# Altium PCB DB32.PcbDoc (part 5 of 8)
Units mil, origin at the board's own origin, x right, y up, seen from the top; angles counter-clockwise.
Board outline 3236.22 x 4456.69 mil, 8 copper layers (Top Layer, MidLayer1, MidLayer2, GND-Layer5, MidLayer3, VCC, MidLayer4, Bottom Layer), stack 61.8 mil thick; 207 components, 474 nets, 1777 pads, 1474 vias.
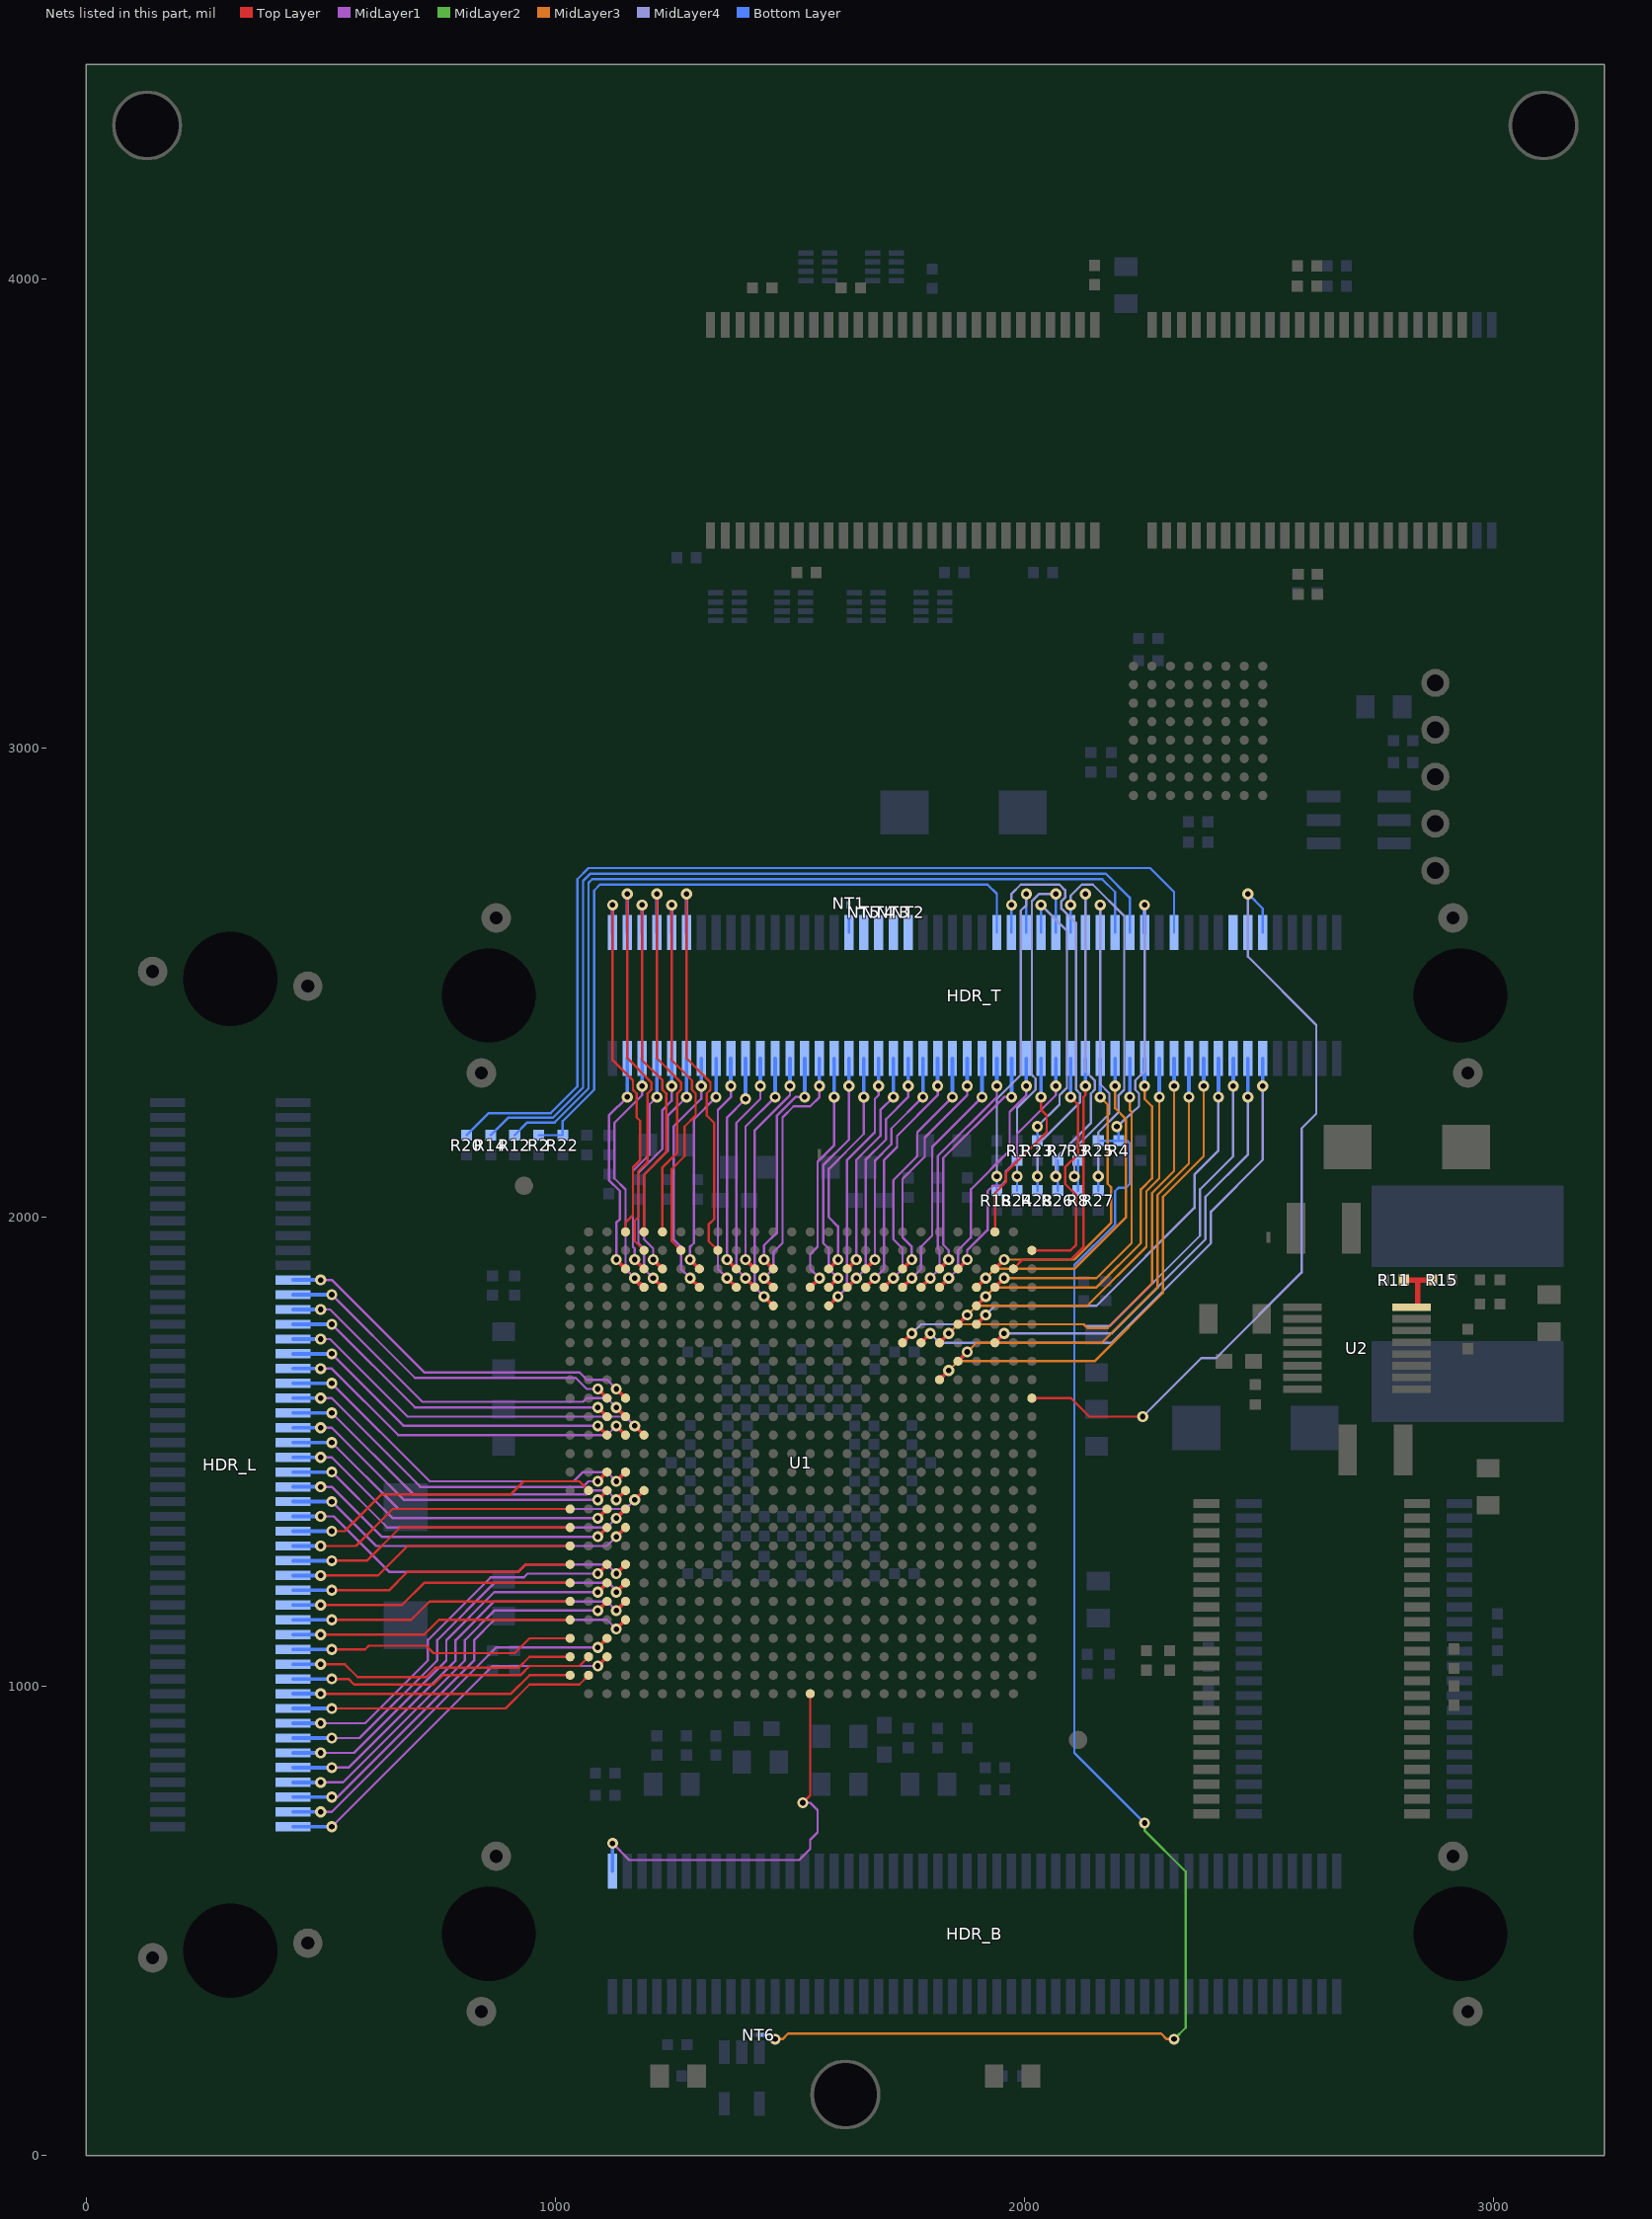
[diagram p11: the nets of this part, all layers, seen from the top]

## Via types
v1: diameter 23.62, hole 11.81, Top Layer to Bottom Layer, 839 vias
v2: diameter 23.62, hole 11.81, Top Layer to Bottom Layer, tented both sides, 499 vias
v3: diameter 27.56, hole 15.75, Top Layer to Bottom Layer, 135 vias
v4: diameter 23.62, hole 11.81, Top Layer to Bottom Layer, tented top, 1 vias

## Nets (pads, with @x,y where several pads share a name; then routed paths per layer and width w, separated by ;. In a path a pad name is that pad's centre, name@x,y a point inside that pad or via, vN(x,y) a via of type N, cw(c..) or ccw(c..) an arc to the next point about the centre after c; other vN are vias at no path point) (continued)
EXTEND_B12: HDR_L.26 U1.K4 | length 813
  Top Layer w7.87: v1(1129.92,1633.86) U1.K4@1149.61,1614.17
  MidLayer1 w5: v2(500,1866.14) 523.62,1866.14 720.47,1669.29 956.69,1669.29 968.5,1669.29 1051.18,1669.29 1066.93,1653.54 1110.23,1653.54 v1(1129.92,1633.86)
  Bottom Layer w7.87: HDR_L.26@440.94,1866.14 v2(500,1866.14)
EXTEND_B13: HDR_L.28 U1.K3 | length 760.6
  Top Layer w7.87: v1(1090.55,1633.86) U1.K3@1110.24,1614.17
  MidLayer1 w5: v2(523.62,1834.65) 700.79,1657.48 956.69,1657.48 968.5,1657.48 1043.31,1657.48 1066.93,1633.86 v1(1090.55,1633.86)
  Bottom Layer w7.87: HDR_L.28@440.94,1834.64 v2(523.62,1834.65)
EXTEND_B14: HDR_L.30 U1.L4 | length 809.8
  Top Layer w7.87: v1(1129.92,1594.49) U1.L4@1149.61,1574.8
  MidLayer1 w5: v2(500,1803.15) 519.68,1803.15 716.54,1606.3 956.69,1606.3 968.5,1606.3 1059.06,1606.3 1066.93,1614.17 1110.23,1614.17 v1(1129.92,1594.49)
  Bottom Layer w7.87: HDR_L.30@440.94,1803.15 v2(500,1803.15)
EXTEND_B15: HDR_L.32 U1.L3 | length 750.8
  Top Layer w7.87: v1(1090.55,1594.49) U1.L3@1110.24,1574.8
  MidLayer1 w5: v2(523.62,1771.66) 700.79,1594.49 956.69,1594.49 968.5,1594.49 v1(1090.55,1594.49)
  Bottom Layer w7.87: HDR_L.32@440.94,1771.65 v2(523.62,1771.66)
EXTEND_B16: HDR_L.34 U1.M5 | length 832.8
  Top Layer w7.87: v1(1169.29,1555.12) U1.M5@1188.98,1535.43
  MidLayer1 w5: v2(500,1740.16) 519.68,1740.16 685.04,1574.8 956.69,1574.8 968.5,1574.8 1149.61,1574.8 v1(1169.29,1555.12)
  Bottom Layer w7.87: HDR_L.34@440.94,1740.15 v2(500,1740.16)
EXTEND_B17: HDR_L.36 U1.M3 | length 741
  Top Layer w7.87: v1(1090.55,1555.12) U1.M3@1110.24,1535.43
  MidLayer1 w5: v2(523.62,1708.66) 677.17,1555.12 956.69,1555.12 968.51,1555.12 v1@1090.55,1555.12
  Bottom Layer w7.87: HDR_L.36@440.94,1708.66 v2(523.62,1708.66)
EXTEND_B18: HDR_L.38 U1.M4 | length 783.7
  Top Layer w7.87: v1(1129.92,1555.12) U1.M4@1149.61,1535.43
  MidLayer1 w5: v2(500,1677.17) 523.62,1677.17 665.36,1535.43 956.69,1535.43 968.5,1535.43 1110.23,1535.43 v1(1129.92,1555.12)
  Bottom Layer w7.87: HDR_L.38@440.94,1677.16 v2(500,1677.17)
EXTEND_B19: HDR_L.40 U1.P4 | length 819.6
  Top Layer w7.87: v1(1129.92,1437.01) U1.P4@1149.61,1456.69
  MidLayer1 w5: v2(523.62,1645.67) 732.29,1437.01 956.69,1437.01 968.5,1437.01 1039.37,1437.01 1059.06,1456.69 1110.23,1456.69 v1(1129.92,1437.01)
  Bottom Layer w7.87: HDR_L.40@440.94,1645.67 v2(523.62,1645.67)
EXTEND_B20: HDR_L.42 U1.P3 | length 760.6
  Top Layer w7.87: v1(1090.55,1437.01) U1.P3@1110.24,1456.69
  MidLayer1 w5: v2(500,1614.17) 523.62,1614.17 641.73,1496.06 712.6,1425.2 956.69,1425.2 968.5,1425.2 1059.06,1425.2 1070.87,1437.01 v1(1090.55,1437.01)
  Bottom Layer w7.87: HDR_L.42@440.94,1614.17 v2(500,1614.17)
EXTEND_B21: HDR_L.44 U1.R4 | length 800
  Top Layer w7.87: v1(1129.92,1397.64) U1.R4@1149.61,1417.32
  MidLayer1 w5: v2(523.62,1582.68) 696.85,1409.45 956.69,1409.45 968.5,1409.45 1066.93,1409.45 1074.8,1417.32 1110.23,1417.32 v1(1129.92,1397.64)
  Bottom Layer w7.87: HDR_L.44@440.94,1582.67 v2(523.62,1582.68)
EXTEND_B22: HDR_L.46 U1.R3 | length 741
  Top Layer w7.87: v1(1090.55,1397.64) U1.R3@1110.24,1417.32
  MidLayer1 w5: v2(500,1551.18) 523.62,1551.18 677.17,1397.64 956.69,1397.64 968.5,1397.64 v1(1090.55,1397.64)
  Bottom Layer w7.87: HDR_L.46@440.94,1551.18 v2(500,1551.18)
EXTEND_B23: HDR_L.48 U1.R5 | length 823
  Top Layer w7.87: v1(1169.29,1397.64) U1.R5@1188.98,1417.32
  MidLayer1 w5: v2(523.62,1519.68) 665.36,1377.95 956.69,1377.95 968.5,1377.95 1149.61,1377.95 v1(1169.29,1397.64)
  Bottom Layer w7.87: HDR_L.48@440.94,1519.68 v2(523.62,1519.68)
EXTEND_B24: HDR_L.50 U1.T3 | length 731.3
  Top Layer w7.87: v1(1090.55,1358.27) U1.T3@1110.24,1377.95
  MidLayer1 w5: v2(500,1488.19) 523.62,1488.19 653.54,1358.27 956.69,1358.27 968.5,1358.27 1062.99,1358.27 v1(1090.55,1358.27)
  Bottom Layer w7.87: HDR_L.50@440.94,1488.19 v2(500,1488.19)
EXTEND_B25: HDR_L.52 U1.T4 | length 773.9
  Top Layer w7.87: v1(1129.92,1358.27) U1.T4@1149.61,1377.95
  MidLayer1 w5: v2(523.62,1456.69) 641.73,1338.58 956.69,1338.58 968.5,1338.58 1110.24,1338.58 v1(1129.92,1358.27)
  Bottom Layer w7.87: HDR_L.52@440.94,1456.69 v2(523.62,1456.69)
EXTEND_B26: HDR_L.54 U1.U3 | length 721.5
  Top Layer w7.87: v1(1090.55,1318.9) U1.U3@1110.24,1338.58
  MidLayer1 w5: v2(500,1425.2) 523.62,1425.2 629.92,1318.9 956.69,1318.9 968.5,1318.9 v1(1090.55,1318.9)
  Bottom Layer w7.87: HDR_L.54@440.94,1425.19 v2(500,1425.2)
EXTEND_B27: HDR_L.56 U1.U4 | length 764.1
  Top Layer w7.87: v1(1129.92,1318.9) U1.U4@1149.61,1338.58
  MidLayer1 w5: v2(523.62,1393.7) 618.11,1299.21 956.69,1299.21 968.5,1299.21 1110.24,1299.21 v1(1129.92,1318.9)
  Bottom Layer w7.87: HDR_L.56@440.94,1393.7 v2(523.62,1393.7)
EXTEND_B28: HDR_L.58 U1.W4 | length 780.4
  Top Layer w7.87: v1(1129.92,1240.16) U1.W4@1149.61,1259.84
  MidLayer1 w5: v2(500,1362.21) 527.56,1362.21 645.67,1244.09 921.26,1244.09 937.01,1259.84 956.69,1259.84 968.5,1259.84 1110.23,1259.84 v1(1129.92,1240.16)
  Bottom Layer w7.87: HDR_L.58@440.94,1362.2 v2(500,1362.21)
EXTEND_B29: HDR_L.60 U1.R2 | length 682.1
  Top Layer w5: v2(523.62,1330.71) 551.18,1330.71 629.92,1409.45 905.51,1409.45 933.07,1437.01 956.69,1437.01 968.5,1437.01 1051.18,1437.01 U1.R2@1070.87,1417.32
  Bottom Layer w7.87: HDR_L.60@440.94,1330.71 v2(523.62,1330.71)
EXTEND_B30: HDR_L.62 U1.T1 | length 623.2
  Top Layer w5: v2(500,1299.21) 574.8,1299.21 653.54,1377.95 956.69,1377.95 968.5,1377.95 U1.T1@1031.5,1377.95
  Bottom Layer w7.87: HDR_L.62@440.94,1299.21 v2(500,1299.21)
EXTEND_B31: HDR_L.64 U1.U1 | length 619.9
  Top Layer w5: v2(523.62,1267.72) 598.43,1267.72 669.29,1338.58 956.69,1338.58 968.5,1338.58 U1.U1@1031.5,1338.58
  Bottom Layer w7.87: HDR_L.64@440.94,1267.71 v2(523.62,1267.72)
EXTEND_B32: HDR_L.66 U1.V1 | length 616.6
  Top Layer w5: v2(500,1236.22) 622.05,1236.22 685.04,1299.21 956.69,1299.21 968.5,1299.21 U1.V1@1031.5,1299.21
  Bottom Layer w7.87: HDR_L.66@440.94,1236.22 v2(500,1236.22)
EXTEND_B33: HDR_L.68 U1.W1 | length 613.4
  Top Layer w5: v2(523.62,1204.72) 645.67,1204.72 685.04,1244.09 921.26,1244.09 937.01,1259.84 956.69,1259.84 968.5,1259.84 U1.W1@1031.5,1259.84
  Bottom Layer w7.87: HDR_L.68@440.94,1204.72 v2(523.62,1204.72)
EXTEND_B34: HDR_L.70 U1.Y1 | length 610.1
  Top Layer w5: v2(500,1173.23) 673.23,1173.23 720.47,1220.47 956.69,1220.47 968.5,1220.47 U1.Y1@1031.5,1220.47
  Bottom Layer w7.87: HDR_L.70@440.94,1173.23 v2(500,1173.23)
EXTEND_B35: HDR_L.72 U1.AA1 | length 606.9
  Top Layer w5: v2(523.62,1141.73) 692.91,1141.73 732.28,1181.1 956.69,1181.1 968.5,1181.1 U1.AA1@1031.5,1181.1
  Bottom Layer w7.87: HDR_L.72@440.94,1141.73 v2(523.62,1141.73)
EXTEND_B36: HDR_L.74 U1.AB1 | length 603.6
  Top Layer w5: v2(500,1110.24) 720.47,1110.24 751.97,1141.73 956.69,1141.73 968.5,1141.73 U1.AB1@1031.5,1141.73
  Bottom Layer w7.87: HDR_L.74@440.94,1110.23 v2(500,1110.24)
EXTEND_B37: HDR_L.76 U1.AC1 | length 613.4
  Top Layer w5: v2(523.62,1078.74) 594.49,1078.74 602.36,1086.61 724.41,1086.61 740.16,1070.87 913.39,1070.87 944.88,1102.36 956.69,1102.36 968.5,1102.36 U1.AC1@1031.5,1102.36
  Bottom Layer w7.87: HDR_L.76@440.94,1078.74 v2(523.62,1078.74)
EXTEND_B38: HDR_L.78 U1.AD1 | length 619.9
  Top Layer w5: v2(500,1047.25) 551.18,1047.25 578.74,1019.68 724.41,1019.68 744.09,1039.37 921.26,1039.37 944.88,1062.99 956.69,1062.99 968.5,1062.99 U1.AD1@1031.5,1062.99
  Bottom Layer w7.87: HDR_L.78@440.94,1047.24 v2(500,1047.25)
EXTEND_B39: HDR_L.80 U1.AD2 | length 659.3
  Top Layer w5: v2(523.62,1015.75) 559.05,1015.75 570.87,1003.94 740.16,1003.94 759.84,1023.62 925.2,1023.62 944.88,1043.31 956.69,1043.31 968.5,1043.31 1051.18,1043.31 U1.AD2@1070.87,1062.99
  Bottom Layer w7.87: HDR_L.80@440.94,1015.74 v2(523.62,1015.75)
EXTEND_B40: HDR_L.82 U1.AE1 | length 606.9
  Top Layer w5: v2(500,984.25) 905.51,984.25 944.88,1023.62 956.69,1023.62 968.5,1023.62 U1.AE1@1031.5,1023.62
  Bottom Layer w7.87: HDR_L.82@440.94,984.25 v2(500,984.25)
EXTEND_B41: HDR_L.84 U1.AE2 | length 659.3
  Top Layer w5: v2(523.62,952.75) 893.7,952.75 944.88,1003.94 956.69,1003.94 968.5,1003.94 1051.18,1003.94 U1.AE2@1070.87,1023.62
  Bottom Layer w7.87: HDR_L.84@440.94,952.75 v2(523.62,952.75)
EXTEND_B42: HDR_L.86 U1.W3 | length 834.9
  Top Layer w7.87: v1(1090.55,1240.16) U1.W3@1110.24,1259.84
  MidLayer1 w5: v2(500,921.26) 594.49,921.26 728.35,1055.12 728.35,1098.43 862.2,1232.28 933.07,1232.28 940.94,1240.16 956.69,1240.16 968.5,1240.16 v1(1090.55,1240.16)
  Bottom Layer w7.87: HDR_L.86@440.94,921.26 v2(500,921.26)
EXTEND_B43: HDR_L.88 U1.Y4 | length 891.3
  Top Layer w7.87: v1(1129.92,1200.79) U1.Y4@1149.61,1220.47
  MidLayer1 w5: v2(523.62,889.76) 582.68,889.76 748.03,1055.12 748.03,1098.43 870.08,1220.47 956.69,1220.47 968.5,1220.47 1114.17,1220.47 1131.89,1202.76 v1@1133.86,1200.79
  Bottom Layer w7.87: HDR_L.88@440.94,889.76 v2(523.62,889.76)
EXTEND_B44: HDR_L.90 U1.Y3 | length 844.7
  Top Layer w7.87: v1(1090.55,1200.79) U1.Y3@1110.24,1220.47
  MidLayer1 w5: v2(500,858.27) 570.87,858.27 767.72,1055.12 767.72,1098.43 870.08,1200.79 956.69,1200.79 968.5,1200.79 v1(1090.55,1200.79)
  Bottom Layer w7.87: HDR_L.90@440.94,858.26 v2(500,858.27)
EXTEND_B45: HDR_L.92 U1.AA4 | length 924.9
  Top Layer w7.87: v1(1129.92,1161.42) U1.AA4@1149.61,1181.1 v1(1129.92,1161.42)
  MidLayer1 w5: v2(523.62,826.77) 559.05,826.77 787.4,1055.12 787.4,1098.43 870.08,1181.1 956.69,1181.1 968.5,1181.1 1110.23,1181.1 v1(1129.92,1161.42)
  Bottom Layer w7.87: HDR_L.92@440.94,826.77 v2(523.62,826.77)
EXTEND_B46: HDR_L.94 U1.AA3 | length 902
  Top Layer w7.87: v1(1090.55,1161.42) U1.AA3@1110.24,1181.1 v1(1090.55,1161.42)
  MidLayer1 w5: v2(500,795.28) 547.24,795.28 807.09,1055.12 807.09,1098.43 870.08,1161.42 956.69,1161.42 968.5,1161.42 v1(1090.55,1161.42) 1070.87,1161.41
  Bottom Layer w7.87: HDR_L.94@440.94,795.27 v2(500,795.28)
EXTEND_B47: HDR_L.96 U1.AB4 | length 974.1
  Top Layer w7.87: v1(1129.92,1122.05) U1.AB4@1149.61,1141.73 v1(1129.92,1122.05)
  MidLayer1 w5: v2(523.62,763.78) 535.43,763.78 826.77,1055.12 826.77,1098.43 870.08,1141.73 956.69,1141.73 968.5,1141.73 1110.23,1141.73 ; 1070.87,1141.73 1110.24,1141.73 ; v1(1129.92,1122.05) 1110.23,1141.73
  Bottom Layer w7.87: HDR_L.96@440.95,763.78 v2(523.62,763.78)
EXTEND_B48: HDR_L.98 U1.AC3 | length 822.6
  Top Layer w7.87: v1(1090.55,1082.68) U1.AC3@1110.24,1102.36
  MidLayer1 w5: v2(500,732.28) 523.62,732.28 874.02,1082.68 956.69,1082.68 968.5,1082.68 v1(1090.55,1082.68)
  Bottom Layer w7.87: HDR_L.98@440.94,732.28 v2(500,732.28)
EXTEND_B49: HDR_L.100 U1.AD3 | length 819.3
  Top Layer w7.87: v1(1090.55,1043.31) U1.AD3@1110.24,1062.99
  MidLayer1 w5: v2(523.62,700.79) 866.14,1043.31 956.69,1043.31 968.5,1043.3 v1(1090.55,1043.31)
  Bottom Layer w7.87: HDR_L.100@440.94,700.78 v2(523.62,700.79)
EXTEND_C0: HDR_T.89 U1.G20 | length 1220.9
  Top Layer w7.87: U1.G20@1779.53,1732.28 v1(1799.21,1751.97)
  MidLayer4 w5: v1(1799.21,1751.97) 1818.9,1732.28 2078.74,1732.28 2090.55,1732.28 2185.04,1732.28 2397.64,1944.88 2397.64,2011.81 2507.87,2122.05 v2(2507.87,2279.53)
  Bottom Layer w7.87: v2(2507.87,2279.53) HDR_T.89@2507.88,2338.58 v2(2507.87,2279.53)
EXTEND_C1: HDR_T.87 U1.G24 | length 963.5
  Top Layer w7.87: U1.G24@1937.01,1732.28 v1(1956.69,1751.97)
  MidLayer4 w5: v1(1956.69,1751.97) 2078.74,1751.97 2090.55,1751.97 2185.04,1751.97 2385.83,1952.76 2385.83,2043.31 2476.38,2133.86 v2(2476.38,2255.9)
  Bottom Layer w7.87: v2(2476.38,2255.9) HDR_T.87@2476.38,2338.58
EXTEND_C2: HDR_T.85 U1.G19 | length 1139
  Top Layer w7.87: U1.G19@1740.16,1732.28 v1(1759.84,1751.97)
  MidLayer4 w5: v1(1759.84,1751.97) 1779.53,1771.65 2078.74,1771.65 2090.55,1771.65 2125.98,1771.65 2129.92,1767.72 2181.1,1767.72 2374.02,1960.63 2374.02,2059.06 2444.88,2129.92 v2(2444.88,2279.53)
  Bottom Layer w7.87: v2(2444.88,2279.53) HDR_T.85@2444.88,2338.58
EXTEND_C3: HDR_T.83 U1.F23 | length 907.4
  Top Layer w7.87: U1.F23@1897.64,1771.65 v1(1917.33,1791.34)
  MidLayer4 w5: v1(1917.33,1791.34) 1937.01,1811.02 2078.74,1811.02 2090.55,1811.02 2153.54,1811.02 2362.2,2019.68 2362.2,2090.55 2413.38,2141.73 v2(2413.38,2255.9)
  Bottom Layer w7.87: v2(2413.38,2255.9) HDR_T.83@2413.39,2338.58
EXTEND_C4: HDR_T.81 U1.J21 | length 1088.9
  Top Layer w7.87: U1.J21@1818.9,1653.54 v1(1838.59,1673.23)
  MidLayer3 w5: v1(1838.59,1673.23) 1858.27,1692.91 2078.74,1692.91 2090.55,1692.91 2149.61,1692.91 2295.28,1838.58 2295.28,2043.31 2381.89,2129.92 v2(2381.89,2279.53)
  Bottom Layer w7.87: v2(2381.89,2279.53) HDR_T.81@2381.89,2338.58
EXTEND_C5: HDR_T.79 U1.H22 | length 1006.3
  Top Layer w7.87: U1.H22@1858.27,1692.91 v1(1877.96,1712.6)
  MidLayer3 w5: v1(1877.96,1712.6) 1897.64,1732.28 2078.74,1732.28 2090.55,1732.28 2165.35,1732.28 2283.46,1850.39 2283.46,2047.24 2350.39,2114.17 v2(2350.39,2255.9)
  Bottom Layer w7.87: v2(2350.39,2255.9) HDR_T.79@2350.4,2338.58
EXTEND_C6: HDR_T.77 U1.G21 | length 1011.3
  Top Layer w7.87: U1.G21@1818.9,1732.28 v1(1838.58,1751.97)
  MidLayer3 w5: v1(1838.58,1751.97) 1858.27,1771.65 2078.74,1771.65 2090.55,1771.65 2125.98,1771.65 2133.86,1763.78 2177.17,1763.78 2271.65,1858.27 2271.65,2051.18 2318.89,2098.42 v2(2318.89,2279.53)
  Bottom Layer w7.87: v2(2318.89,2279.53) HDR_T.77@2318.9,2338.58
EXTEND_C7: HDR_T.75 U1.F22 | length 883.1
  Top Layer w7.87: U1.F22@1858.27,1771.65 v1(1877.96,1791.34)
  MidLayer3 w5: v1(1877.96,1791.34) 1897.64,1811.02 2078.74,1811.02 2090.55,1811.02 2133.86,1811.02 2259.84,1937.01 2259.84,2055.12 2287.4,2082.68 v2(2287.4,2255.9)
  Bottom Layer w7.87: v2(2287.4,2255.9) HDR_T.75@2287.4,2338.58
EXTEND_C8: HDR_T.73 U1.E23 | length 815.8
  Top Layer w7.87: U1.E23@1897.64,1811.02 v1(1917.32,1830.71)
  MidLayer3 w5: v1(1917.32,1830.71) 1937.01,1850.39 2078.74,1850.39 2090.55,1850.39 2153.54,1850.39 2248.03,1944.88 2248.03,2059.06 2271.65,2082.68 2271.65,2236.21 2255.9,2251.97 v2(2255.9,2279.53)
  Bottom Layer w7.87: v2(2255.9,2279.53) HDR_T.73@2255.91,2338.58
EXTEND_C9: HDR_T.71 U1.D24 | length 725.8
  Top Layer w7.87: U1.D24@1937.01,1850.39 v1(1956.7,1870.08)
  MidLayer3 w5: v1(1956.7,1870.08) 2078.74,1870.08 2090.55,1870.08 2153.54,1870.08 2228.35,1944.88 2228.35,2224.41 2224.41,2228.35 v2(2224.41,2255.9)
  Bottom Layer w7.87: v2(2224.41,2255.9) HDR_T.71@2224.41,2338.58
EXTEND_C10: HDR_T.69 U1.D23 | length 729.2
  Top Layer w7.87: U1.D23@1897.64,1850.39 v1(1917.33,1870.08)
  MidLayer3 w5: v1(1917.33,1870.08) 1937.01,1889.76 2078.74,1889.76 2090.55,1889.76 2106.3,1889.76 2216.54,2000 2216.54,2208.66 2192.91,2232.29 v2(2192.91,2279.53)
  Bottom Layer w7.87: v2(2192.91,2279.53) HDR_T.69@2192.91,2338.58
EXTEND_C11: HDR_T.67 U1.C24 | length 649
  Top Layer w7.87: U1.C24@1937.01,1889.76 v1(1956.69,1909.45)
  MidLayer3 w5: v1(1956.69,1909.45) 2078.74,1909.45 2090.55,1909.45 2106.3,1909.45 2185.04,1988.19 2185.04,2062.99 2177.16,2070.87 2177.16,2240.16 v2(2161.42,2255.9)
  Bottom Layer w7.87: v2(2161.42,2255.9) HDR_T.67@2161.42,2338.58
EXTEND_C12: HDR_T.65 U1.C25 | length 572.4
  Top Layer w5: U1.C25@1976.38,1889.76 1996.06,1909.45 2078.74,1909.45 2090.55,1909.45 2098.43,1909.45 2125.98,1937.01 2125.98,2255.91 2129.92,2259.84 v2(2129.92,2279.53)
  Bottom Layer w7.87: v2(2129.92,2279.53) HDR_T.65@2129.92,2338.58
EXTEND_C13: HDR_T.63 U1.B26 | length 524.7
  Top Layer w5: U1.B26@2015.75,1929.13 2078.74,1929.13 2090.55,1929.13 2098.43,1929.13 2110.24,1940.94 2110.24,2047.24 2086.61,2070.87 2086.61,2106.3 2114.17,2133.86 2114.17,2240.16 v2(2098.42,2255.9)
  Bottom Layer w7.87: v2(2098.42,2255.9) HDR_T.63@2098.43,2338.58
EXTEND_C14: HDR_T.61 U1.C22 | length 544.5
  Top Layer w7.87: U1.C22@1858.27,1889.76 v1(1877.95,1909.45)
  MidLayer1 w5: v1(1877.95,1909.45) 1877.95,1929.13 1921.26,1972.44 1921.26,2031.5 1921.26,2043.31 1921.26,2055.12 1933.07,2066.93 1948.82,2066.93 1960.63,2078.74 1960.63,2098.43 1984.25,2122.05 1984.25,2177.17 2066.93,2259.84 v2(2066.93,2279.53)
  Bottom Layer w7.87: v2(2066.93,2279.53) HDR_T.61@2066.93,2338.58
EXTEND_C15: HDR_T.59 U1.A24 | length 420.6
  Top Layer w5: U1.A24@1937.01,1968.5 1937.01,2031.49 1937.01,2043.31 1937.01,2051.18 1960.63,2074.8 1960.63,2094.49 2047.24,2181.1 2047.24,2216.54 2035.43,2228.35 v2(2035.43,2255.9)
  Bottom Layer w7.87: v2(2035.43,2255.9) HDR_T.59@2035.43,2338.58
EXTEND_C16: HDR_T.57 U1.D21 | length 564.8
  Top Layer w7.87: U1.D21@1818.9,1850.39 v1(1838.59,1870.08)
  MidLayer1 w5: v1(1838.59,1870.08) 1858.27,1889.76 1858.27,1929.13 1885.83,1956.69 1885.83,2031.5 1885.83,2043.31 1885.83,2059.06 1968.5,2141.73 1968.5,2224.41 2003.94,2259.84 v2(2003.93,2279.53)
  Bottom Layer w7.87: v2(2003.93,2279.53) HDR_T.57@2003.94,2338.58
EXTEND_C17: HDR_T.55 U1.C21 | length 531.4
  Top Layer w7.87: U1.C21@1818.9,1889.76 v1(1838.58,1909.45)
  MidLayer1 w5: v1(1838.58,1909.45) 1838.58,1929.13 1826.77,1940.95 1826.77,2031.5 1826.77,2043.31 1826.77,2125.98 1956.69,2255.9 v2(1972.44,2255.9)
  Bottom Layer w7.87: v2(1972.44,2255.9) HDR_T.55@1972.44,2338.58
EXTEND_C18: HDR_T.53 U1.D20 | length 558.3
  Top Layer w7.87: U1.D20@1779.53,1850.39 v1(1799.21,1870.08)
  MidLayer1 w5: v1(1799.21,1870.08) 1818.9,1889.76 1818.9,1929.13 1814.96,1933.07 1814.96,2031.5 1814.96,2043.31 1814.96,2129.92 1940.94,2255.9 v2(1940.94,2279.53)
  Bottom Layer w7.87: v2(1940.94,2279.53) HDR_T.53@1940.95,2338.58
EXTEND_C19: HDR_T.51 U1.D19 | length 558.3
  Top Layer w7.87: U1.D19@1740.16,1850.39 v1(1759.84,1870.08)
  MidLayer1 w5: v1(1759.84,1870.08) 1779.53,1889.76 1779.53,1937.01 1803.15,1960.63 1803.15,2031.5 1803.15,2043.31 1803.15,2149.61 v2(1909.45,2255.9)
  Bottom Layer w7.87: v2(1909.45,2255.9) HDR_T.51@1909.45,2338.58
EXTEND_C20: HDR_T.49 U1.C19 | length 522.2
  Top Layer w7.87: U1.C19@1740.16,1889.76 v1(1759.84,1909.45)
  MidLayer1 w5: v1(1759.84,1909.45) 1759.84,1937.01 1740.16,1956.7 1740.16,2031.5 1740.16,2043.31 1740.16,2081.69 1787.4,2128.94 1787.4,2169.29 1877.95,2259.84 v2(1877.95,2279.53)
  Bottom Layer w7.87: v2(1877.95,2279.53) HDR_T.49@1877.95,2338.58
EXTEND_C21: HDR_T.47 U1.D18 | length 564.8
  Top Layer w7.87: U1.D18@1700.79,1850.39 v1(1720.47,1870.08)
  MidLayer1 w5: v1(1720.47,1870.08) 1740.16,1889.76 1740.16,1933.07 1720.47,1952.76 1720.47,2031.5 1720.47,2043.31 1720.47,2078.74 1771.65,2129.92 1771.65,2181.1 v2(1846.46,2255.9)
  Bottom Layer w7.87: v2(1846.46,2255.9) HDR_T.47@1846.46,2338.58
EXTEND_C22: HDR_T.45 U1.D17 | length 551.8
  Top Layer w7.87: U1.D17@1661.42,1850.39 v1(1681.1,1870.08)
  MidLayer1 w5: v1(1681.1,1870.08) 1700.79,1889.77 1700.79,2031.5 1700.79,2043.31 1700.79,2122.05 1728.35,2149.61 1728.35,2173.23 1814.96,2259.84 v2(1814.96,2279.53)
  Bottom Layer w7.87: v2(1814.96,2279.53) HDR_T.45@1814.96,2338.58
EXTEND_C23: HDR_T.43 U1.C17 | length 499.4
  Top Layer w7.87: U1.C17@1661.42,1889.76 v1(1681.1,1909.45)
  MidLayer1 w5: v1(1681.1,1909.45) 1681.1,2031.5 1681.1,2043.31 1681.1,2120.08 1716.54,2155.51 1716.54,2188.98 v2(1783.46,2255.9)
  Bottom Layer w7.87: v2(1783.46,2255.9) HDR_T.43@1783.47,2338.58
EXTEND_C24: HDR_T.41 U1.D16 | length 542
  Top Layer w7.87: U1.D16@1622.05,1850.39 v1(1641.73,1870.08)
  MidLayer1 w5: v1(1641.73,1870.08) 1661.42,1889.77 1661.42,2031.5 1661.42,2043.31 1661.42,2122.05 1704.72,2165.35 1704.72,2208.66 1751.97,2255.9 v2(1751.97,2279.53)
  Bottom Layer w7.87: v2(1751.97,2279.53) HDR_T.41@1751.97,2338.58
EXTEND_C25: HDR_T.39 U1.C16 | length 489.6
  Top Layer w7.87: U1.C16@1622.05,1889.76 v1(1641.73,1909.45)
  MidLayer1 w5: v1(1641.73,1909.45) 1641.73,2031.5 1641.73,2043.31 1641.73,2122.05 1692.91,2173.23 1692.91,2228.35 v2(1720.47,2255.9)
  Bottom Layer w7.87: v2(1720.47,2255.9) HDR_T.39@1720.47,2338.58
EXTEND_C26: HDR_T.37 U1.E15 | length 571.6
  Top Layer w7.87: U1.E15@1582.68,1811.02 v1(1602.36,1830.71)
  MidLayer1 w5: v1(1602.36,1830.71) 1622.05,1850.39 1622.05,2031.5 1622.05,2043.31 1622.05,2122.05 1681.1,2181.1 1681.1,2251.97 1688.98,2259.84 v2(1688.97,2279.53)
  Bottom Layer w7.87: v2(1688.97,2279.53) HDR_T.37@1688.98,2338.58
EXTEND_C27: HDR_T.35 U1.C15 | length 496.1
  Top Layer w7.87: U1.C15@1582.68,1889.76 v1(1602.36,1909.45)
  MidLayer1 w5: v1(1602.36,1909.45) 1602.36,1980.32 1582.68,2000 1582.68,2031.5 1582.68,2043.31 1582.68,2102.36 1657.48,2177.16 v2(1657.48,2255.9)
  Bottom Layer w7.87: v2(1657.48,2255.9) HDR_T.35@1657.48,2338.58
EXTEND_C28: HDR_T.33 U1.D15 | length 532.2
  Top Layer w7.87: U1.D15@1582.68,1850.39 v1(1602.36,1870.08)
  MidLayer1 w5: v1(1602.36,1870.08) 1582.68,1889.77 1582.68,1933.07 1570.87,1944.88 1570.87,2031.5 1570.87,2043.31 1570.87,2110.24 1625.98,2165.35 v2(1625.98,2279.53)
  Bottom Layer w7.87: v2(1625.98,2279.53) HDR_T.33@1625.99,2338.58
EXTEND_C29: HDR_T.31 U1.D14 | length 525.7
  Top Layer w7.87: U1.D14@1543.31,1850.39 v1(1562.99,1870.08)
  MidLayer1 w5: v1(1562.99,1870.08) 1543.31,1889.77 1543.31,1921.26 1559.06,1937.01 1559.06,2031.5 1559.06,2043.31 1559.06,2118.11 1562.99,2122.05 1594.49,2153.54 v2(1594.49,2255.9)
  Bottom Layer w7.87: v2(1594.49,2255.9) HDR_T.31@1594.49,2338.58
EXTEND_C30: HDR_T.29 U1.D12 | length 566
  Top Layer w7.87: v1(1444.88,1870.08) U1.D12@1464.57,1850.39
  MidLayer1 w5: v1(1444.88,1870.08) 1464.57,1889.77 1464.57,1925.2 1484.25,1944.88 1484.25,2031.5 1484.25,2043.31 1484.25,2212.6 1507.87,2236.22 1543.31,2236.22 1562.99,2255.9 v2(1562.99,2279.53)
  Bottom Layer w7.87: v2(1562.99,2279.53) HDR_T.29@1562.99,2338.58
EXTEND_C31: HDR_T.27 U1.C12 | length 504.4
  Top Layer w7.87: v1(1444.88,1909.45) U1.C12@1464.57,1889.76
  MidLayer1 w5: v1(1444.88,1909.45) 1444.88,1939.96 1472.44,1967.52 1472.44,2031.5 1472.44,2043.31 1472.44,2216.54 1511.81,2255.9 v2(1531.5,2255.9)
  Bottom Layer w7.87: v2(1531.5,2255.9) HDR_T.27@1531.5,2338.58
EXTEND_C32: HDR_T.25 U1.E12 | length 574.9
  Top Layer w7.87: v1(1444.88,1830.71) U1.E12@1464.57,1811.02
  MidLayer1 w5: v1(1444.88,1830.71) 1425.2,1850.39 1425.2,2031.5 1425.2,2043.31 1425.2,2185.04 1500,2259.84 v2(1500,2279.53)
  Bottom Layer w7.87: v2(1500,2279.53) HDR_T.25@1500,2338.58
EXTEND_C33: HDR_T.23 U1.C11 | length 483.1
  Top Layer w7.87: v1(1405.51,1909.45) U1.C11@1425.2,1889.76
  MidLayer1 w5: v1(1405.51,1909.45) 1405.51,2031.5 1405.51,2043.31 1405.51,2192.91 v2(1468.5,2255.9)
  Bottom Layer w7.87: v2(1468.5,2255.9) HDR_T.23@1468.5,2338.58
EXTEND_C34: HDR_T.21 U1.D11 | length 525.7
  Top Layer w7.87: v1(1405.51,1870.08) U1.D11@1425.2,1850.39
  MidLayer1 w5: v1(1405.51,1870.08) 1385.83,1889.76 1385.83,2031.5 1385.83,2043.31 1385.83,2200.79 1437.01,2251.97 v2(1437.01,2279.53)
  Bottom Layer w7.87: v2(1437.01,2279.53) HDR_T.21@1437.01,2338.58
EXTEND_C35: HDR_T.19 U1.C10 | length 469.3
  Top Layer w7.87: v1(1366.14,1909.45) U1.C10@1385.83,1889.76
  MidLayer1 w5: v1(1366.14,1909.45) 1366.14,2031.5 1366.14,2043.31 1366.14,2212.6 v2(1405.51,2251.97)
  Bottom Layer w7.87: v2@1405.51,2255.9 HDR_T.19@1405.51,2338.58
EXTEND_C36: HDR_T.17 U1.D10 | length 515.9
  Top Layer w7.87: v1(1366.14,1870.08) U1.D10@1385.83,1850.39
  MidLayer1 w5: v1(1366.14,1870.08) 1346.46,1889.76 1346.46,2031.5 1346.46,2043.31 1346.46,2228.35 1374.02,2255.91 v2(1374.02,2279.53)
  Bottom Layer w7.87: v2(1374.02,2279.53) HDR_T.17@1374.02,2338.58
EXTEND_C37: HDR_T.15 U1.C8 | length 479.8
  Top Layer w7.87: v1(1287.4,1909.45) U1.C8@1307.09,1889.76
  MidLayer1 w5: v1(1287.4,1909.45) 1287.4,1937.01 1295.28,1944.89 1295.28,2031.5 1295.28,2043.31 1295.28,2208.66 v2(1342.52,2255.9)
  Bottom Layer w7.87: v2(1342.52,2255.9) HDR_T.15@1342.52,2338.58
EXTEND_C38: HDR_T.13 U1.D8 | length 535.5
  Top Layer w7.87: v1(1287.4,1870.08) U1.D8@1307.09,1850.39
  MidLayer1 w5: v1(1287.4,1870.08) 1267.72,1889.76 1267.72,1937.01 1251.97,1952.76 1251.97,2031.5 1251.97,2043.31 1251.97,2192.91 1311.02,2251.97 v2(1311.02,2279.53)
  Bottom Layer w7.87: v2(1311.02,2279.53) HDR_T.13@1311.02,2338.58
EXTEND_C39: HDR_T.11 U1.C6 | length 502.6
  Top Layer w7.87: v1(1208.66,1909.45) U1.C6@1228.35,1889.76
  MidLayer1 w5: v1(1208.66,1909.45) 1208.66,1933.07 1188.98,1952.76 1188.98,2031.5 1188.98,2043.31 1188.98,2090.55 1240.16,2141.73 1240.16,2216.53 v2(1279.53,2255.9)
  Bottom Layer w7.87: v2(1279.53,2255.9) HDR_T.11@1279.53,2338.58
EXTEND_C40: HDR_T.12 U1.B9 | length 886.5
  Top Layer w5: v2(1279.53,2688.98) 1279.53,2338.58 1330.71,2287.4 1330.71,2271.65 1322.83,2263.78 1322.83,2216.54 1338.58,2200.79 1338.58,2043.31 1338.58,2031.5 1338.58,1996.06 1326.77,1984.25 1326.77,1948.82 U1.B9@1346.46,1929.13
  Bottom Layer w7.87: HDR_T.12@1279.53,2606.3 v2(1279.53,2688.98)
EXTEND_C41: HDR_T.9 U1.D6 | length 538.7
  Top Layer w7.87: v1(1208.66,1870.08) U1.D6@1228.35,1850.39
  MidLayer1 w5: v1(1208.66,1870.08) 1188.98,1889.76 1188.98,1933.07 1177.17,1944.88 1177.17,2031.5 1177.17,2043.31 1177.17,2094.49 1228.35,2145.67 1228.35,2228.35 1248.03,2248.03 v2(1248.03,2279.53)
  Bottom Layer w7.87: v2(1248.03,2279.53) HDR_T.9@1248.03,2338.58
EXTEND_C42: HDR_T.10 U1.B7 | length 845.8
  Top Layer w5: v2(1248.03,2665.35) 1248.03,2334.65 1291.34,2291.34 1291.34,2271.65 1299.21,2263.78 1299.21,2216.54 1275.59,2192.91 1275.59,2129.92 1248.03,2102.36 1248.03,2043.31 1248.03,2031.49 1248.03,1948.82 U1.B7@1267.72,1929.13
  Bottom Layer w7.87: HDR_T.10@1248.03,2606.3 v2(1248.03,2665.35)
EXTEND_C43: HDR_T.7 U1.C5 | length 479.8
  Top Layer w7.87: v1(1169.29,1909.45) U1.C5@1188.98,1889.76
  MidLayer1 w5: v1(1169.29,1909.45) 1169.29,1933.07 1165.35,1937.01 1165.35,2031.5 1165.35,2043.31 1165.35,2098.43 1200.79,2133.86 1200.79,2240.16 v2(1216.54,2255.9)
  Bottom Layer w7.87: v2(1216.54,2255.9) HDR_T.7@1216.54,2338.58
EXTEND_C44: HDR_T.8 U1.A6 | length 840.7
  Top Layer w5: v2(1216.54,2688.98) 1216.54,2338.58 1267.72,2287.4 1267.72,2271.65 1259.84,2263.78 1259.84,2137.8 1228.35,2106.3 1228.35,2043.31 1228.35,2031.5 U1.A6@1228.35,1968.5
  Bottom Layer w7.87: HDR_T.8@1216.54,2606.3 v2(1216.54,2688.98)
EXTEND_C45: HDR_T.5 U1.D5 | length 566.6
  Top Layer w7.87: v1@1169.28,1866.15 U1.D5@1188.97,1846.46 ; v1(1169.29,1870.08) U1.D5@1188.98,1850.39
  MidLayer1 w5: v1(1169.29,1870.08) 1149.61,1889.76 1149.61,2031.5 1149.61,2043.31 1149.61,2059.06 1125.98,2082.68 1125.98,2200.79 1185.04,2259.84 v2(1185.04,2279.53)
  Bottom Layer w7.87: v2(1185.04,2279.53) HDR_T.5@1185.04,2338.58
EXTEND_C46: HDR_T.6 U1.A5 | length 855.7
  Top Layer w5: v2(1185.04,2665.35) 1185.04,2334.65 1228.35,2291.34 1228.35,2271.65 1236.22,2263.78 1236.22,2137.8 1188.98,2090.55 1188.98,2043.31 1188.98,2031.5 U1.A5@1188.98,1968.5
  Bottom Layer w7.87: HDR_T.6@1185.04,2606.3 v2(1185.04,2665.35) HDR_T.6@1185.04,2606.3
EXTEND_C47: HDR_T.3 U1.C4 | length 486.3
  Top Layer w7.87: v1(1129.92,1909.45) U1.C4@1149.61,1889.76
  MidLayer1 w5: v1(1129.92,1909.45) 1129.92,1988.19 1137.8,1996.06 1137.8,2031.5 1137.8,2043.31 1137.8,2055.12 1114.17,2078.74 1114.17,2216.53 v2(1153.54,2255.9)
  Bottom Layer w7.87: v2(1153.54,2255.9) HDR_T.3@1153.54,2338.58
EXTEND_C48: HDR_T.4 U1.B5 | length 945.6
  Top Layer w5: v2(1153.54,2688.98) 1153.54,2338.58 1204.72,2287.4 1204.72,2271.65 1196.85,2263.78 1196.85,2118.11 1177.17,2098.43 1177.17,2043.31 1177.17,2031.49 1177.17,2000 1169.29,1992.13 1169.29,1948.82 U1.B5@1188.98,1929.13
  Bottom Layer w7.87: 1153.54,2665.35 HDR_T.4@1153.54,2606.3 v2(1153.54,2688.98)
EXTEND_C49: HDR_T.2 U1.A4 | length 793.4
  Top Layer w5: v2(1122.05,2665.35) 1122.05,2334.65 1165.35,2291.34 1165.35,2271.65 1173.23,2263.78 1173.23,2212.6 1181.1,2204.72 1181.1,2122.05 1165.35,2106.3 1165.35,2043.31 1165.35,2031.5 1165.35,2003.94 1149.61,1988.19 U1.A4@1149.61,1968.5
  Bottom Layer w7.87: HDR_T.2@1122.05,2606.3 v2(1122.05,2665.35)
FB: R11.2 R15.1 U2.8 | length 120.2
  Top Layer w7.87: U2.8@2842.51,1807.09 U2.8@2842.51,1808.25
  Top Layer w11.81: R11.2@2808.58,1866.14 2838.58,1866.14 ; U2.8@2838.58,1807.09 2838.58,1808.25 2838.58,1866.14 ; R15.1@2868.58,1866.14 2838.58,1866.14
FPGA_CCLK: HDR_T.66 R7.1 R26.1 | length 791.4
  MidLayer4 w5: v2(2066.93,2086.61) 2066.93,2125.98 2141.73,2200.79 2141.73,2263.78 2149.61,2271.65 2149.61,2291.34 2129.92,2311.02 v2(2129.92,2688.98)
  Bottom Layer w5: R26.1@2070.86,2056.61 2070.86,2086.61 R7.1@2070.86,2120.55 ; HDR_T.66@2129.92,2606.3 v2(2129.92,2688.98)
FPGA_CLK: HDR_B.2 U1.AF14 | length 870.8
  Top Layer w5: v1(1527.56,751.97) 1543.31,767.72 U1.AF14@1543.31,984.25
  MidLayer1 w5: v2(1122.05,665.35) 1157.48,629.92 1519.69,629.92 1543.31,653.54 1543.31,673.23 1559.06,688.98 1559.06,736.22 1543.31,751.97 v1(1527.56,751.97)
  Bottom Layer w7.87: HDR_B.2@1122.05,606.3 v2(1122.05,665.35)
FPGA_CLK1: HDR_T.90 U1.K26 | length 1694.4
  Top Layer w5: U1.K26@2015.75,1614.17 2099.12,1614.17 2138.5,1574.79 v1(2251.96,1574.79)
  MidLayer4 w5: v1(2251.96,1574.79) 2376.85,1699.68 2408.1,1699.68 ; 2408.22,1699.56 2590.55,1881.89 2590.55,2188.98 2622.05,2220.47 2622.05,2409.45 2476.38,2555.12 v2(2476.38,2688.98)
  Bottom Layer w5: v2(2476.38,2688.98) 2507.87,2657.48 HDR_T.90@2507.88,2606.3
FPGA_DIN: HDR_T.64 R27.1 | length 842.3
  MidLayer4 w5: v2(2098.43,2665.35) 2098.43,2685.04 2122.05,2708.66 2145.67,2708.66 2212.6,2641.73 2212.6,2271.65 2200.79,2259.84 2200.79,2224.41 2157.48,2181.1 v2(2157.48,2086.61)
  Bottom Layer w5: HDR_T.64@2098.43,2606.3 v2(2098.43,2665.35) v2@2098.43,2669.29 ; R27.1@2157.48,2056.61 v2(2157.48,2086.61)
FPGA_DONE: HDR_T.74 NT6.2 R4.1 R25.1 | length 3631.5
  MidLayer2 w5: v1(2255.91,708.66) 2255.91,692.71 2343.44,605.18 2343.44,272.57 v1(2318.9,248.03)
  MidLayer3 w5: v1(1468.5,248.03) 1484.25,248.03 1496.06,259.84 2291.34,259.84 2303.15,248.03 v1(2318.9,248.03)
  MidLayer4 w5: v2(2196.85,2192.91) 2244.09,2236.22 2244.09,2263.78 2236.22,2271.65 2236.22,2291.34 2255.9,2311.02 v2(2255.9,2665.35)
  Bottom Layer w5: NT6.2@1443.71,257.11 1459.43,257.11 v1(1468.5,248.03) ; R25.1@2157.48,2162.91 R4.1@2200.78,2162.91 ; v2(2196.85,2192.91) 2200.78,2192.91 R4.1@2200.78,2162.91 ; v1(2255.91,708.66) 2106.3,858.27 2106.3,1897.64 2192.91,1984.25 2192.91,2055.12 2200.79,2062.99 2216.54,2062.99 2224.41,2070.87 2224.41,2157.48 2218.98,2162.91 R4.1@2200.78,2162.91
  Bottom Layer w7.87: HDR_T.74@2255.91,2606.3 v2(2255.9,2665.35)
FPGA_ID0: HDR_T.42 NT2.1
FPGA_ID1: HDR_T.40 NT3.1
FPGA_ID2: HDR_T.38 NT4.1
FPGA_ID3: HDR_T.36 NT5.1
FPGA_INIT: HDR_T.68 R3.1 R8.1 | length 740.9
  MidLayer4 w5: v2(2106.3,2086.61) 2106.3,2145.67 2181.1,2220.47 2181.1,2263.78 2161.42,2283.46 v2(2161.42,2665.35)
  Bottom Layer w5: R8.1@2114.17,2056.61 2114.17,2086.61 R3.1@2114.17,2120.55 ; HDR_T.68@2161.42,2606.3 v2(2161.42,2665.35)
FPGA_INSTALLED: HDR_T.34 NT1.1 | length 58.6
  Bottom Layer w5: HDR_T.34@1625.99,2606.3 NT1.1@1625.99,2664.87
FPGA_M0: HDR_T.60 R23.1 | length 610.4
  MidLayer4 w5: v2(2027.56,2192.91) 2074.8,2240.16 2074.8,2259.84 2090.55,2275.59 2090.55,2610.24 v2(2035.43,2665.35)
  Bottom Layer w5: R23.1@2027.55,2162.91 v2(2027.56,2192.91) ; HDR_T.60@2035.43,2606.3 v2(2035.43,2665.35)
FPGA_M1: HDR_T.58 R18.1 | length 741.1
  MidLayer4 w5: v2(1940.94,2086.61) 1940.94,2251.97 1992.13,2303.15 1992.13,2653.54 2003.94,2665.35 v2(2003.94,2688.98)
  Bottom Layer w5: R18.1@1940.94,2056.61 v2(1940.94,2086.61) ; HDR_T.58@2003.94,2606.3 v2(2003.94,2688.98)
FPGA_M2: HDR_T.56 R28.1 | length 907.2
  MidLayer4 w5: v2(1972.44,2665.35) 1972.44,2688.98 1992.13,2708.66 2074.8,2708.66 2086.61,2696.85 2086.61,2681.1 2078.74,2673.23 2078.74,2657.48 2110.24,2625.98 2110.24,2271.65 2118.11,2263.78 2118.11,2244.09 2027.56,2153.54 v2(2027.56,2086.61)
  Bottom Layer w5: HDR_T.56@1972.44,2606.3 v2(1972.44,2665.35) ; R28.1@2027.55,2056.61 v2(2027.56,2086.61)
FPGA_PROG_CLK: HDR_T.88
FPGA_PROG_PWR_ON: HDR_T.86
FPGA_PROGRAM: HDR_T.62 R1.1 R24.1 | length 810.5
  MidLayer4 w5: v2(1984.25,2086.61) 1984.25,2232.28 2023.62,2271.65 2023.62,2295.28 2015.75,2303.15 2015.75,2673.23 2031.5,2688.98 v2(2066.93,2688.98)
  Bottom Layer w5: R24.1@1984.25,2056.61 v2(1984.25,2086.61) R1.1@1984.25,2120.55 ; HDR_T.62@2066.93,2606.3 v2(2066.93,2688.98)
FPGA_TCK: HDR_T.72 R14.1 | length 1947
  Bottom Layer w5: R14.1@862.2,2174.72 899.19,2211.71 994.45,2211.71 1059.06,2276.32 1059.06,2716.54 1074.8,2732.28 2173.23,2732.28 2224.41,2681.1 HDR_T.72@2224.41,2606.3
FPGA_TDI: HDR_T.78 R20.1 | length 2110.3
  Bottom Layer w5: R20.1@811.02,2174.72 858.01,2221.71 990.31,2221.71 1047.24,2278.65 1047.24,2720.47 1070.87,2744.09 2267.72,2744.09 2318.9,2692.91 HDR_T.78@2318.9,2606.3
FPGA_TDO: HDR_T.54 R2.1 R22.1 | length 1554.6
  Bottom Layer w5: R2.1@964.56,2174.72 R22.1@1015.75,2174.72 1015.74,2204.72 1082.68,2271.65 1082.68,2696.16 1095.18,2708.66 1921.26,2708.66 1940.95,2688.98 HDR_T.54@1940.95,2606.3
FPGA_TMS: HDR_T.70 R12.1 | length 1860.5
  Bottom Layer w5: R12.1@913.38,2174.72 940.38,2201.71 998.59,2201.71 1070.87,2273.98 1070.87,2712.6 1078.74,2720.47 2165.35,2720.47 2192.91,2692.91 HDR_T.70@2192.91,2606.3